# Altium PCB Bento_Pad_Mini_PCB.PcbDoc (part 2 of 2)
Units mm, origin at the board's own origin, x right, y up, seen from the top; angles counter-clockwise.
Board outline 80 x 55 mm, 2 copper layers (Top Layer, Bottom Layer), stack 1.448 mm thick; 81 components, 38 nets, 304 pads, 89 vias.
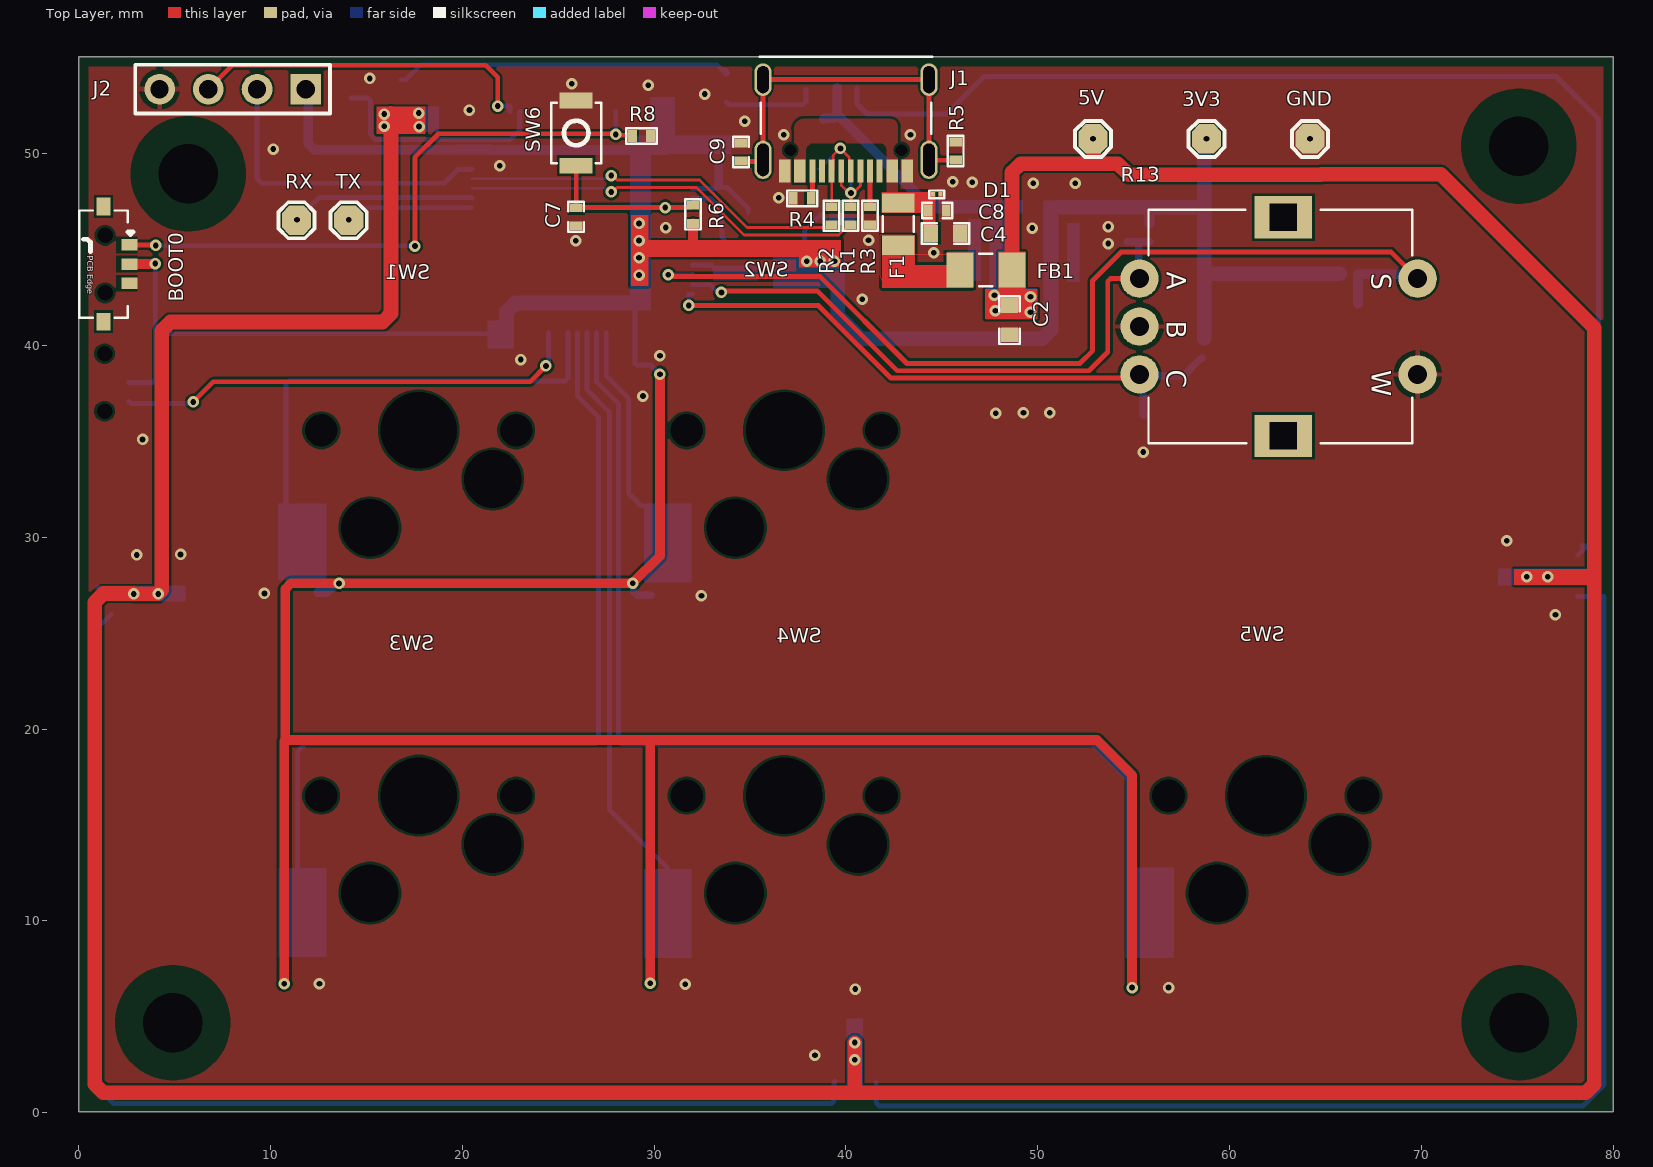
[diagram p0: Top Layer view]

## Part data (continued)
R6 R8 R9 R10 R11 R12 R14 R15 R16 R17 R18 R19: library part RC0402FR-0710KL, "RES 10K OHM 1% 1/16W 0402", Case Code (Imperial)=0402, Case Code (Metric)=1005, LCSC Part Number=C60490, Manufacturer=Yageo, Max Operating Temperature=155°C, Max Power Dissipation=63mW, Min Operating Temperature=-55°C, Power Rating=62.5mW, Resistance=10kR, Resistance Tolerance=1%, Resistor Type="Thick Film", Supplier Part Number 1=603-RC0402FR-0710KL, Temperature Coefficient=100ppm/°C, Voltage Rating=50V, Case/Package=0402, Category="Chip SMD Resistors", ComponentLink1Description=https://datasheet.ciiva.com/7660/38568-7660787.pdf?src-supplier=Element14, ComponentLink1URL=https://datasheet.ciiva.com/7660/38568-7660787.pdf?src-supplier=Element14, ComponentLink2Description=https://datasheet.ciiva.com/7849/1686128-7849814.pdf?src-supplier=Element14, ComponentLink2URL=https://datasheet.ciiva.com/7849/1686128-7849814.pdf?src-supplier=Element14, ComponentLink3Description=https://datasheet.ciiva.com/7983/1018594-7983486.pdf?src-supplier=Element14, ComponentLink3URL=https://datasheet.ciiva.com/7983/1018594-7983486.pdf?src-supplier=Element14, ComponentLink4Description=https://datasheet.ciiva.com/22747/1018594-22747512.pdf?src-supplier=Element14, ComponentLink4URL=https://datasheet.ciiva.com/22747/1018594-22747512.pdf?src-supplier=Element14, ComponentLink5Description=https://datasheet.ciiva.com/12667/pyu-rc0402-51-rohs-l-6-r-12667067.pdf?src-supplier=Mouser, ComponentLink5URL=https://datasheet.ciiva.com/12667/pyu-rc0402-51-rohs-l-6-r-12667067.pdf?src-supplier=Mouser, ComponentLink6Description=https://datasheet.ciiva.com/7849/1784430-7849813.pdf?src-supplier=Element14, ComponentLink6URL=https://datasheet.ciiva.com/7849/1784430-7849813.pdf?src-supplier=Element14, ComponentLink7Description=https://datasheet.ciiva.com/7849/1784430-7849815.pdf?src-supplier=Element14, ComponentLink7URL=https://datasheet.ciiva.com/7849/1784430-7849815.pdf?src-supplier=Element14, Construction=Rectangular, Depth=0.5mm, Features="Moisture Resistant", Height=0.32mm, Item Type=Resistor, Lead Free="Lead Free", Lead Pitch=0.2mm, Length=1mm, Manufacturer Part Number=RC0402FR-0710KL, Military Standard=Not, Number of Pins=2, Number of Terminations=2, Packaging="Tape and Reel", Pricing 1="1=0.10000, 10=0.01400, 50=0.01400, 100=0.00500, 1000=0.00300, 10000=0.00200 (USD)", REACH SVHC="No SVHC", RoHS=Yes, RoHS Compliant=Yes, Series=RC, Stock 1=18648329, Supplier 1=Mouser, Termination=SMD/SMT, Tolerance=1%, Voltage Rating (DC)=50V, Width=0.5mm, Working Voltage=50V
R7: library part RC0402FR-071ML, "RES 1M OHM 1% 1/16W 0402", Case Code (Imperial)=0402, Case Code (Metric)=1005, LCSC Part Number=C138033, Manufacturer=Yageo, Max Operating Temperature=155°C, Max Power Dissipation=63mW, Min Operating Temperature=-55°C, Resistance Tolerance=1%, Resistor Type="Thick Film", Supplier Part Number=311-1.00MLRCT-ND, Temperature Coefficient=100ppm/°C, Voltage Rating=50V, Case/Package=0402, Category="Chip SMD Resistors", ComponentLink1Description=https://datasheet.ciiva.com/11808/0900766b80c66297-11808125.pdf?src-supplier=Rs, ComponentLink1URL=https://datasheet.ciiva.com/11808/0900766b80c66297-11808125.pdf?src-supplier=Rs, ComponentLink2Description=https://datasheet.ciiva.com/46394/1018594-46394951.pdf?src-supplier=Element14, ComponentLink2URL=https://datasheet.ciiva.com/46394/1018594-46394951.pdf?src-supplier=Element14, ComponentLink3Description=https://datasheet.ciiva.com/7849/1018594-7849883.pdf?src-supplier=Element14, ComponentLink3URL=https://datasheet.ciiva.com/7849/1018594-7849883.pdf?src-supplier=Element14, ComponentLink4Description=https://datasheet.ciiva.com/7849/1018594-7849882.pdf?src-supplier=Element14, ComponentLink4URL=https://datasheet.ciiva.com/7849/1018594-7849882.pdf?src-supplier=Element14, ComponentLink5Description=https://datasheet.ciiva.com/16741/pyu-rc0402-51-rohs-l-6-r-16741081.pdf?src-supplier=Future+Electronics, ComponentLink5URL=https://datasheet.ciiva.com/16741/pyu-rc0402-51-rohs-l-6-r-16741081.pdf?src-supplier=Future+Electronics, Construction=Rectangular, Depth=0.5mm, Features="Moisture Resistant", Height=0.32mm, Item Type=Resistor, Lead Free=5697LeadFree, Length=1mm, Manufacturer Part Number=RC0402FR-071ML, Military Standard=Not, Number of Terminations=2, Packaging="Tape and Reel", Power Rating=63mW, Pricing="1=0.1, 10=0.015, 50=0.0088, 100=0.0073, 500=0.00488, 1000=0.00417, 5000=0.00297 (USD)", Reach SVHC Compliant=Unknown, RoHS=Yes, RoHS Compliant=Yes, Series=RC, Stock=6516, Supplier=Digikey, Technology="THICK FILM", Termination=SMD/SMT, Tolerance=1%, Voltage Rating (AC)=50V
R13: "11mm Encoder with 24 Detent Force 20mm Metal Flatted Shaft PC Pin Horizontal/Rear Facing", LCSC Part Number=-, Manufacturer=Bourns, Package=Custom, Supplier Part Number=118-PEC11H-4220F-S0024-ND, ComponentLink1Description=Digikey, ComponentLink1URL=https://www.digikey.com/en/products/detail/bourns-inc/PEC11H-4220F-S0024/12349532, Item Type=Encoder, Manufacturer Part Number=PEC11H-4220F-S0024, Pricing="1=3.04, 5=2.746, 10=2.565, 25=2.3516, 75=2.194, 150=2.0646, 300=1.89023, 450=1.77209, 975=1.65958 (USD)", RoHS=No, Stock=1001, Supplier=Digikey
R20: library part RC0603FR-07499RL, "RES 499 OHM 1% 1/10W 0603", Case Code (Imperial)=0603, Case Code (Metric)=1608, LCSC Part Number=C137714, Manufacturer=Yageo, Max Operating Temperature=155°C, Max Power Dissipation=100mW, Min Operating Temperature=-55°C, Package Quantity=1, Resistor Type="Thick Film", Supplier Part Number 1=1995585, Temperature Coefficient=100ppm/°C, Tolerance=1%, Voltage Rating=50V, Case/Package=0603, Category="Chip SMD Resistors", ComponentLink1Description=https://datasheet.ciiva.com/11808/0900766b80f96399-11808558.pdf?src-supplier=RSComponents, ComponentLink1URL=https://datasheet.ciiva.com/11808/0900766b80f96399-11808558.pdf?src-supplier=RSComponents, ComponentLink2Description=https://datasheet.ciiva.com/2453/pyu-r-int-thick-7-2453956.pdf?src-supplier=Digi-Key, ComponentLink2URL=https://datasheet.ciiva.com/2453/pyu-r-int-thick-7-2453956.pdf?src-supplier=Digi-Key, ComponentLink3Description=https://datasheet.ciiva.com/2453/pyu-r-int-thick-7-2453957.pdf?src-supplier=Digi-Key, ComponentLink3URL=https://datasheet.ciiva.com/2453/pyu-r-int-thick-7-2453957.pdf?src-supplier=Digi-Key, ComponentLink4Description=https://datasheet.ciiva.com/2453/pyu-r-int-thick-7-2453955.pdf?src-supplier=Digi-Key, ComponentLink4URL=https://datasheet.ciiva.com/2453/pyu-r-int-thick-7-2453955.pdf?src-supplier=Digi-Key, ComponentLink5Description=https://datasheet.ciiva.com/12558/rc0603-272842-12558391.pdf?src-supplier=Mouser, ComponentLink5URL=https://datasheet.ciiva.com/12558/rc0603-272842-12558391.pdf?src-supplier=Mouser, ComponentLink6Description=https://datasheet.ciiva.com/8885/pyu-rc0603-51-rohs-l-4-8885483.pdf?src-supplier=Avnet, ComponentLink6URL=https://datasheet.ciiva.com/8885/pyu-rc0603-51-rohs-l-4-8885483.pdf?src-supplier=Avnet, Construction=Rectangular, Contact Plating=Tin,Matte, Depth=0.8mm, Features="Moisture Resistant", Height=0.45mm, Lead Free="Lead Free", Length=1.6mm, Manufacturer Part Number=RC0603FR-07499RL, Military Standard=Not, Mount="Surface Mount", Number of Terminations=2, Packaging="Tape and Reel", Power Rating=100mW, Pricing 1="5000=0.00300, 10000=0.00300, 15000=0.00300, 20000=0.00200 (GBP)", Radiation Hardening=No, Resistance=499R, RoHS=Yes, RoHS Compliant=Yes, Series=RC, Size Code=0603, Stock 1=900, Supplier 1=RSComponents, Technology="THICK FILM", Termination=SMD/SMT, Voltage Rating (DC)=50V, Width=0.031inch
SW1 SW2 SW3 SW4 SW5: "SMD,14.5x5.9mm Mechanical Keyboard Shaft ROHS", LCSC Part Number=C41430893, Manufacturer=HanElectricity, Package=SMD,14.5x5.9mm, ComponentLink1Description=LCSC, ComponentLink1URL=https://www.lcsc.com/product-detail/Mechanical-Keyboard-Shaft_HanElectricity-CPG151101S11-16_C41430893.html?s_z=n_%2520CPG151101S11-16, Item Type="Mechanical Keyboard Shaft", Manufacturer Part Number=CPG151101S11-16
SW6: "SWITCH TACTILE SPST-NO 0.05A 12V", Contact Current Rating=50mA, Contact Resistance=100mR, Insulation Resistance=100MR, LCSC Part Number=C231329, Manufacturer=Omron, Max Operating Temperature=70°C, Max Voltage Rating (DC)=12V, Min Operating Temperature=-25°C, Operating Force=1.5N, Package Quantity=1, Ratings="Dust Proof,IP40", Supplier Part Number 1=SW1020DKR-ND, Actuator Length=0.4mm, Actuator Type=Standard, ComponentLink1Description=http://www.farnell.com/datasheets/60838.pdf?src-supplier=Farnell, ComponentLink1URL=http://www.farnell.com/datasheets/60838.pdf?src-supplier=Farnell, ComponentLink2Description=http://www.farnell.com/datasheets/60838.pdf?src-supplier=Element14, ComponentLink2URL=http://www.farnell.com/datasheets/60838.pdf?src-supplier=Element14, ComponentLink3Description=https://omronfs.omron.com/en_US/ecb/products/pdf/en-b3u.pdf?src-supplier=Digi-Key, ComponentLink3URL=https://omronfs.omron.com/en_US/ecb/products/pdf/en-b3u.pdf?src-supplier=Digi-Key, ComponentLink4Description=http://www.omron.com/ecb/products/pdf/en-b3u.pdf?src-supplier=Digi-Key, ComponentLink4URL=http://www.omron.com/ecb/products/pdf/en-b3u.pdf?src-supplier=Digi-Key, ComponentLink5Description=https://www.distrelec.biz/Web/Downloads/he/et/B3U_eng_datasheet.pdf?mime=application%2Fpdf&src-supplier=Distrelec, ComponentLink5URL=https://www.distrelec.biz/Web/Downloads/he/et/B3U_eng_datasheet.pdf?mime=application%2Fpdf&src-supplier=Distrelec, ComponentLink6Description=http://www.onlinecomponents.com/productFiles/mf-OM/en-b3u.pdf?src-supplier=Onlinecomponents.com, ComponentLink6URL=http://www.onlinecomponents.com/productFiles/mf-OM/en-b3u.pdf?src-supplier=Onlinecomponents.com, ComponentLink7Description=https://www.verical.com/server-webapp/html/getDatasheet?partID=552554&src-supplier=Verical, ComponentLink7URL=https://www.verical.com/server-webapp/html/getDatasheet?partID=552554&src-supplier=Verical, ComponentLink8Description=http://www.farnell.com/datasheets/1685550.pdf?src-supplier=Element14, ComponentLink8URL=http://www.farnell.com/datasheets/1685550.pdf?src-supplier=Element14, ComponentLink9Description=http://www.farnell.com/datasheets/2610940.pdf?src-supplier=Farnell, ComponentLink9URL=http://www.farnell.com/datasheets/2610940.pdf?src-supplier=Farnell, ComponentLink10Description=https://www.alliedelec.com/m/d/4c8a9ef82804fc3c241a13c1e298fd73.pdf?src-supplier=Allied+Electronics, ComponentLink10URL=https://www.alliedelec.com/m/d/4c8a9ef82804fc3c241a13c1e298fd73.pdf?src-supplier=Allied+Electronics, Contact Material=Silver, Current Rating=50mA, Depth=2.5mm, Electrical Life=200000Cycles, Height=1.2mm, Illumination Type=Non-Illuminated,Illuminated, Item Type=Switch, Lead Free="Lead Free", Length=4mm, Manufacturer Part Number=B3U-1000P, Max Current Rating=50mA, Mechanical Life=200000Cycles, Mount="Surface Mount", Orientation=Straight, Packaging="Tape and Reel", Pricing 1="1=1, 10=0.961, 25=0.9064, 50=0.7976, 100=0.7251, 250=0.68888, 500=0.67074, 1000=0.52571 (USD)", REACH SVHC=Unknown, Stock 1=116454, Supplier 1=Digi-Key, Switch Function=Off-Mom, Switch Travel=0.15mm, Termination=SMD/SMT, Throw Configuration=SPST, Voltage Rating (DC)=12V, Weight=0.000776oz, Width=3mm
U1: "IC REG LINEAR 3.3V 1A SOT223-6", LCSC Part Number=C485803, Manufacturer="Texas Instruments", Supplier Part Number=595-TPS79633DCQR, Category="Voltage Regulators - Linear", ComponentLink1Description=https://datasheet.ciiva.com/2045/tps79601-2045264.pdf?src-supplier=Digi-Key, ComponentLink1URL=https://datasheet.ciiva.com/2045/tps79601-2045264.pdf?src-supplier=Digi-Key, ComponentLink2Description=https://datasheet.ciiva.com/22704/1846966-22704703.pdf?src-supplier=Element14, ComponentLink2URL=https://datasheet.ciiva.com/22704/1846966-22704703.pdf?src-supplier=Element14, ComponentLink3Description=https://datasheet.ciiva.com/41462/001015136-da-01-en-ic-reg-ldo-3-3v-1-tps79633dcqr-sot-6-tid-41462982.pdf?src-supplier=Conrad, ComponentLink3URL=https://datasheet.ciiva.com/41462/001015136-da-01-en-ic-reg-ldo-3-3v-1-tps79633dcqr-sot-6-tid-41462982.pdf?src-supplier=Conrad, Item Type=IC, Length=6.5mm, Manufacturer Part Number=TPS79633DCQR, Pricing="1=3.24, 10=2.75, 50=2.75, 100=2.39, 1000=1.72, 10000=1.56 (USD)", RoHS=Yes, Stock=3089, Supplier=Mouser, Thickness=1.6mm, Width=3.5mm
U2: "IC MCU 32BIT 256KB FLASH 64LQFP", Case/Package=LQFP, Clock Frequency=72MHz, LCSC Part Number=C8323, Manufacturer=STMicroelectronics, Max Operating Temperature=85°C, Max Supply Voltage=3.6V, Min Operating Temperature=-40°C, Min Supply Voltage=2V, Package Quantity=960, Supplier Part Number 1=511-STM32F103RCT6, Category=Microcontrollers, ComponentLink1Description=https://datasheet.ciiva.com/4845/cd00191185-4845648.pdf?src-supplier=Mouser, ComponentLink1URL=https://datasheet.ciiva.com/4845/cd00191185-4845648.pdf?src-supplier=Mouser, ComponentLink2Description=https://datasheet.ciiva.com/8054/1831497-8054949.pdf?src-supplier=Element14, ComponentLink2URL=https://datasheet.ciiva.com/8054/1831497-8054949.pdf?src-supplier=Element14, ComponentLink3Description=https://datasheet.ciiva.com/5752/cd00191185-5752853.pdf?src-supplier=Farnell, ComponentLink3URL=https://datasheet.ciiva.com/5752/cd00191185-5752853.pdf?src-supplier=Farnell, ComponentLink4Description=https://datasheet.ciiva.com/9224/cd00191185-9224408.pdf?src-supplier=Avnet, ComponentLink4URL=https://datasheet.ciiva.com/9224/cd00191185-9224408.pdf?src-supplier=Avnet, ComponentLink5Description=https://datasheet.ciiva.com/16382/cd00191185-16382444.pdf?src-supplier=Future+Electronics, ComponentLink5URL=https://datasheet.ciiva.com/16382/cd00191185-16382444.pdf?src-supplier=Future+Electronics, Core Architecture=ARM, Data Bus Width=32b, Height=1.4mm, Interface=I2C,SPI,USB,CAN,USART, Item Type=IC, Lead Free="Lead Free", Length=10mm, Manufacturer Part Number=STM32F103RCT6, Memory Format=FLASH, Memory Size=256KB, Number of ADC Channels=16, Number of I/Os=51, Number of Timers/Counters=8, Packaging=Tray, Pins=64, Pricing 1="1=9.74000, 10=8.79000, 50=8.38000, 100=7.28000, 1000=5.58000, 10000=5.58000 (USD)", RAM Size=48KB, RoHS=Yes, RoHS Compliant=Yes, Series=STM32F103RC, Stock 1=44788, Supplier 1=Mouser, Weight=0.012088oz, Width=10mm
U3: "IC BUF NON-INVERT 5.5V SOT23-5", Case/Package=SOT-23-5, High Level Output Current=-8mA, LCSC Part Number=C100024, Low Level Output Current=8mA, Manufacturer="Texas Instruments", Max Operating Temperature=125°C, Max Supply Voltage=5.5V, Min Operating Temperature=-40°C, Min Supply Voltage=1.6V, Package Quantity=3000, Quiescent Current=1uA, Supplier Part Number 1=296-37176-6-ND, ComponentLink1Description=http://www.ti.com/lit/pdf/sdyu001?src-supplier=Digi-Key, ComponentLink1URL=http://www.ti.com/lit/pdf/sdyu001?src-supplier=Digi-Key, ComponentLink2Description=http://www.ti.com/lit/ds/symlink/sn74lv1t34.pdf?src-supplier=Avnet, ComponentLink2URL=http://www.ti.com/lit/ds/symlink/sn74lv1t34.pdf?src-supplier=Avnet, Item Type=IC, Lead Free="Lead Free", Logic Function=Buffer,Inverting, Manufacturer Part Number=SN74LV1T34DBVR, Mount="Surface Mount", Number of Bits=1, Number of Bits per Element=1, Number of Channels=1, Number of Elements=1, Number of Input Lines=1, Number of Inputs=1, Number of Output Lines=1, Number of Outputs=1, Number of Pins=5, Operating Supply Current=8mA, Packaging="Tape and Reel", Polarity=Non-Inverting, Pricing 1="1=0.43, 10=0.349, 25=0.3192, 100=0.2374, 250=0.2152, 500=0.17808, 1000=0.13356 (USD)", Propagation Delay=15.5ns, Radiation Hardening=No, REACH SVHC="No SVHC", RoHS Compliant=Yes, Stock 1=37360, Supplier 1=Digi-Key, Weight=0.000353oz
X1: library part 0153G2-8.000F20DTNJL, "8MHz Surface Mount Crystal 20pF ±10ppm ±30ppm SMD5032 Crystals ROHS", LCSC Part Number=C19270155, Manufacturer=HCI, Package=SMD5032, ComponentLink1Description=LCSC, ComponentLink1URL=https://www.lcsc.com/product-detail/Crystals_HCI-0153G2-8-000F20DTNJL_C19270155.html, Item Type=Crystal, Manufacturer Part Number=0153G2-8.000F20DTNJL

## Free pads (board coordinates)
  round 0 hole 3.1 unplated paste-2539.97 mask+0.051: MH(4.902,4.699) MH(5.715,48.946) MH(75.082,50.394) MH(75.108,4.699)

## Via types
v1: diameter 0.6, hole 0.3, Top Layer to Bottom Layer, tented both sides, 86 vias
v2: diameter 0.6, hole 0.3, Top Layer to Bottom Layer, 3 vias

## Nets (pads, with @x,y where several pads share a name; then routed paths per layer and width w, separated by ;. In a path a pad name is that pad's centre, name@x,y a point inside that pad or via, vN(x,y) a via of type N, cw(c..) or ccw(c..) an arc to the next point about the centre after c; other vN are vias at no path point)
3V3: 3V3.1 BOOT0.C BOOT1.C C1.2 C10.1 C11.1 C12.1 C13.1 C14.2 C18.2 C33.1 FB2.2 J2.1 R6.2 R10.1 R11.2 R12.2 R14.2 R15.1 R16.1 R17.1 R18.1 U1.4 U2.1 U2.19 U2.32 U2.48 U2.64 | length 236.9
  Top Layer w0.508: BOOT0.C 3.988,44.245 v1(3.988,44.272) ; v1(10.719,6.731) 10.719,19.384 10.77,19.435 ; v1(29.794,6.756) 29.794,19.435 ; v1(30.302,38.506) 30.302,29.032 v1(28.88,27.61) 28.874,27.604 13.574,27.604 v1(13.568,27.598) 13.556,27.61 11.067,27.61 10.77,27.312 10.77,19.435 ; 32.029,45.187 R6.2 ; v1(54.915,6.528) 54.915,17.602 53.082,19.435 29.794,19.435 ; 10.77,19.435 29.794,19.435
  Bottom Layer w0.254: BOOT1.C 3.839,38.073 3.988,38.222 3.988,40.615 ; v1(3.988,44.272) 3.988,40.615 ; 22.022,40.615 3.988,40.615 ; 28.922,42.574 29.032,42.685 ; C12.1@28.998,39.052 U2.19 28.998,42.104 ; C12.1 29.134,38.951 29.167,38.984 29.817,38.984 30.295,38.506 v1(30.302,38.506) ; 29.189,44.056 29.225,44.021 ; 29.21,46.749 29.185,46.723 29.185,44.133 29.261,44.056 29.225,44.021 ; 29.426,42.618 29.185,42.86 29.185,43.98 29.225,44.021 ; 33.164,50.732 33.172,50.724
  Bottom Layer w0.381: v1(28.88,27.61) 28.922,27.568 28.922,27.169 29.103,26.987 R15.1
  Bottom Layer w0.508: v1(10.719,6.731) 10.719,7.455 R16.1 ; J2.1@11.963,53.365 11.963,50.526 12.286,50.203 C33.1@18.326,50.203 ; R10.1 12.916,27.14 13.356,27.58 13.533,27.58 v1@13.551,27.598 ; C33.1@18.453,50.203 19.717,50.203 19.74,50.226 21.256,50.226 ; 21.438,50.226 21.256,50.226 ; 22.022,40.615 22.022,40.64 ; 29.192,50.185 29.202,50.195 ; 29.235,50.228 29.202,50.195 ; v1(29.794,6.756) R17.1 ; 30.455,50.47 30.645,50.279 ; 31.382,50.47 30.874,50.47 30.645,50.241 30.645,50.195 29.202,50.195 ; v1(54.915,6.528) R18.1 ; R12.2@55.829,46.368 55.829,47.219 55.855,47.219 ; 21.256,50.226 21.287,50.195 29.202,50.195
  Bottom Layer w0.762: 22.022,40.64 22.301,40.919 22.301,41.768 22.748,42.215 29.108,42.215 ; FB2.2@36.779,44.187 FB2.2@36.789,44.196 ; v1@39.395,44.425 39.573,44.247 39.573,41.586 40.799,40.361 50.239,40.361 50.686,40.807 U1.4@50.686,44.426 ; C1.2@50.851,47.219 55.829,47.219 ; 55.855,47.219 58.623,47.219 ; R11.2@58.674,40.385 58.674,43.739 ; v1(58.801,50.775) 58.674,50.775 58.674,43.739 ; R14.2@65.748,43.739 58.674,43.739
  other v1: 29.21,43.675 37.948,44.399 38.659,44.399 39.395,44.399 29.21,44.573 29.21,45.47 29.21,46.368
3V3#: C27.1 FB2.1 U2.13 | length 1.6
  Bottom Layer w0.254: U2.13 32.979,44.195 33.21,43.963 33.21,43.904 33.312,43.802 C27.1
5V: 5V.1 C2.2 C3.2 C5.2 C15.2 C23.2 C24.2 C25.2 C26.2 FB1.2 LED1.2 LED2.2 LED3.2 LED4.2 R19.2 U1.2 U3.5 | length 241.6
  Top Layer w0.762: v1(15.926,52.07) 16.243,52.07 16.269,52.095 16.281,52.083 16.281,41.671 15.835,41.224 4.781,41.224 4.335,40.778 4.335,27.246 v1(4.14,27.051) v1(2.87,27.051) 2.851,27.07 1.285,27.07 0.838,26.624 0.838,1.488 1.285,1.041 40.437,1.041 78.573,1.041 79.019,1.488 79.019,27.889 78.981,27.927 ; 40.462,1.067 v1(40.462,3.658) ; FB1.2 48.655,49.04 49.101,49.487 54.171,49.487 54.762,48.895 64.752,48.895 64.781,48.924 71.017,48.924 79.019,40.922 79.019,27.965 78.981,27.927 ; v2(52.883,50.775) 52.908,50.749 52.908,49.563 ; v1(76.581,27.94) 78.969,27.94 78.981,27.927
  Bottom Layer w0.381: 47.955,46.977 48.044,46.977
  Bottom Layer w0.508: C15.2 38.849,51.829 38.875,51.854 39.367,51.854 39.55,52.038 ; LED1.2 39.55,52.038 ; C5.2@47.828,47.131 44.456,47.131 39.55,52.038
  other v1: 40.462,2.769 75.489,27.94 49.619,41.732 47.79,41.808 49.619,42.545 47.739,42.621 17.744,51.414 15.926,51.435 17.729,52.121
BOOT_0: BOOT0.1 R8.1 U2.60 | length 32.5
  Top Layer w0.254: BOOT0.1 3.983,45.245 v1(4.011,45.218) ; v1(17.526,45.187) 17.526,49.809 18.754,51.038 27.676,51.038 ; v1@27.777,51.059 27.941,51.059 v1(27.998,51.003) ; v1@27.998,50.993 28.031,50.96 28.834,50.96 R8.1
  Bottom Layer w0.254: v1(4.011,45.218) 4.026,45.202 17.51,45.202 v1(17.526,45.187) ; v1(27.998,51.003) U2.60
BOOT_1: BOOT1.1 R9.2 U2.28 | length 24.4
  Top Layer w0.254: v1(5.969,37.059) 7.022,38.112 23.532,38.112 v1(24.359,38.938)
  Bottom Layer w0.254: BOOT1.1 2.73,36.97 5.786,36.97 5.875,37.059 v1(5.969,37.059) ; v1(24.359,38.938) 24.359,39.032 24.498,39.171 U2.28
D+: D3.1 J1.A6 J1.B6 R2.1 | length 6.2
  Top Layer w0.14: R2.1 39.25,47.238 J1.B6@39.25,49.092 ; J1.B6 39.33,49.191 39.33,49.897 v1(39.708,50.275) ; v1@39.726,50.292 v1(39.708,50.275) ; J1.A6 40.17,49.191 40.17,49.813 v1(39.708,50.275)
  Bottom Layer w0.14: D3.1 38.616,49.2 39.691,50.275 v1(39.708,50.275)
D-: D2.1 J1.A7 J1.B7 R1.1 | length 4.8
  Top Layer w0.14: J1.A7@39.755,49.111 39.755,48.331 40.041,48.045 40.257,48.045 v1@40.259,48.044 ; R1.1 40.259,47.256 v1(40.259,47.957) v1@40.259,48.044 ; J1.B7@40.755,49.111 40.755,48.33 40.468,48.044 v1@40.259,48.044
  Bottom Layer w0.14: v1(40.259,47.957) D2.1@40.259,49.149
ENC_BUTTON: C21.2 R13.S R14.1 U2.14 | length 52.1
  Top Layer w0.254: v1(30.734,43.688) 30.8,43.622 31.028,43.622 31.056,43.594 38.651,43.594 43.18,39.065 52.195,39.065 52.857,39.728 52.857,43.392 54.337,44.872 68.421,44.872 R13.S
  Bottom Layer w0.254: v1(30.734,43.688) 30.737,43.691 31.994,43.691 U2.14
  Bottom Layer w0.508: C21.2 R14.1 69.579,43.713 R13.S
ENC_CHA: C20.2 R12.1 R13.A U2.15 | length 32.5
  Top Layer w0.254: v1(33.503,42.769) 33.569,42.835 38.521,42.835 42.672,38.684 52.668,38.684 53.645,39.661 53.645,43.342 53.794,43.491 R13.A
  Bottom Layer w0.254: U2.15 32.021,43.172 32.923,43.172 33.26,42.835 33.436,42.835 v1(33.503,42.769)
  Bottom Layer w0.381: C20.2 55.26,45.402 ; R13.A 55.26,43.533 55.26,45.402 ; R12.1 55.26,45.402
ENC_CHB: C22.2 R11.1 R13.B U2.16 | length 31.8
  Top Layer w0.254: v1(31.801,42.088) 38.563,42.088 42.348,38.303 55.114,38.303 R13.B
  Bottom Layer w0.254: v1(31.801,42.088) 31.801,42.672 31.975,42.672 U2.16
  Bottom Layer w0.381: R13.B 55.487,38.306 55.487,36.398 55.525,36.36 C22.2 ; R13.B@55.375,38.418 57.601,38.418 58.502,39.319 58.547,39.319 R11.1@58.547,39.342
GND: C1.1 C2.1 C3.1 C4.2 C5.1 C6.1 C7.2 C8.2 C9.1 C10.2 C11.2 C12.2 C13.2 C14.1 C15.1 C16.1 C17.1 C18.1 C20.1 C21.1 C22.1 C23.1 C24.1 C25.1 C26.1 C27.2 C28.1 C29.1 C30.1 C31.1 C32.1 C33.2 D1.2 D2.2 D3.2 GND.1 J1.A1/B12 J1.B1/A12 J2.4 LED1.4 LED2.4 LED3.4 LED4.4 R3.2 R4.2 R5.2 R8.2 R9.1 R13.C R13.W SW1.1 SW2.1 SW3.1 SW4.1 SW5.1 SW6.2 U1.3 U1.6 U2.12 U2.18 U2.31 U2.47 U2.63 U3.3
  other v1: 38.379,2.997 40.488,6.452 56.82,6.528 31.623,6.706 12.548,6.731 76.987,25.959 32.461,26.949 9.677,27.076 3.023,29.083 5.309,29.108 74.447,29.82 55.499,34.442 3.327,35.103 47.803,36.474 49.251,36.5 50.622,36.5 29.413,37.363 23.038,39.268 30.302,39.472 40.843,42.418 44.577,44.831 53.67,45.314 25.908,45.466 41.173,45.491 49.708,46.126 30.607,46.152 53.67,46.203 36.5,47.701 49.759,48.463 51.953,48.456 46.584,48.514 45.568,48.539 21.946,49.378 10.135,50.241 64.186,50.775 36.754,50.993 43.358,50.993 34.722,51.689 20.371,52.273 32.639,53.111 29.693,53.569 25.705,53.645 15.173,53.924
LED_DO_3V3: U2.50 U3.2 | length 11.9
  Bottom Layer w0.254: U3.2 15.066,52.908 15.215,52.759 15.215,50.989 15.47,50.733 19.529,50.733 ; 19.53,50.734 21.466,50.734 ; 21.466,50.733 22.48,50.733 22.975,51.228 22.975,52.172 U2.50
LED_DO_5V0: R20.1 U3.4 | length 17.5
  Bottom Layer w0.254: U3.4 17.044,53.858 17.821,54.635 33.287,54.635 33.693,54.229 R20.1
  Bottom Layer w0.381: R20.1@33.691,54.295 R20.1
NetC6_2: C6.2 U1.5
NetC9_2: C9.2 J1.S1 J1.S2 J1.S3 J1.S4 R5.1 | length 19.6
  Top Layer w0.254: C9.2@34.519,49.593 35.593,49.593 ccw(c35.593,49.681) J1.S1@35.68,49.681 ; J1.S1 J1.S2 J1.S3 J1.S4 44.351,49.656 R5.1
NetF1_2: F1.2 FB1.1
NetJ1_A5: J1.A5 R3.1 | length 1.9
  Top Layer w0.254: R3.1 41.25,49.106 J1.A5@41.255,49.111
NetJ1_B5: J1.B5 R4.1 | length 1.5
  Top Layer w0.254: R4.1@38.202,47.638 ccw(c38.202,47.691) R4.1@38.255,47.691 ; R4.1@38.255,47.676 J1.B5@38.255,49.111
NetLED1_1: LED1.1 R20.2 | length 5
  Bottom Layer w0.254: R20.2 33.909,52.553 37.765,52.553 37.919,52.706 37.919,53.341 LED1.1@37.94,53.362
NetLED1_3: LED1.3 LED2.1 | length 65
  Bottom Layer w0.254: LED1.3 40.575,52.592 41.097,52.07 45.257,52.07 47.213,54.026 77.016,54.026 79.223,51.82 79.223,29.718 79.065,29.56 LED2.1@78.363,29.56 ; LED2.1@78.155,29.075 LED2.1@78.526,29.446
NetLED2_3: LED2.3 LED3.1 | length 66.4
  Bottom Layer w0.254: LED3.1@41.575,1.562 41.575,0.504 41.724,0.356 78.439,0.356 79.531,1.447 79.531,26.924 79.53,26.925 LED2.3 LED2.3@78.124,26.925
NetLED3_3: LED3.3 LED4.1 | length 65
  Bottom Layer w0.254: LED4.1@1.699,25.984 0.762,25.047 0.762,1.55 1.829,0.483 39.224,0.483 39.373,0.632 39.373,1.578 LED3.3@39.425,1.63
NetR19_1: R19.1 U1.1 | length 0
  Bottom Layer w0.508: U1.1@46.75,44.437 U1.1
OSC_IN: C17.2 R7.1 U2.5 X1.1 | length 3.6
  Bottom Layer w0.254: U2.5 33.225,48.195 33.299,48.269 R7.1 33.353,48.244 33.605,48.244 33.617,48.233 33.811,48.233 34.905,47.139 X1.1
OSC_OUT: C16.2 R7.2 U2.6 X1.2 | length 9.9
  Bottom Layer w0.254: U2.6 32.021,47.672 32.923,47.672 33.21,47.384 33.388,47.384 33.49,47.282 33.49,47.171 33.528,47.133 33.528,45.655 33.844,45.339 37.683,45.339 37.832,45.488 37.832,45.965 38.705,46.838 X1.2@38.959,46.584
RST: C7.1 R6.1 SW6.1 U2.7 | length 10
  Top Layer w0.254: C7.1 SW6.1@25.933,49.646 ; C7.1@25.933,47.207 25.953,47.187 30.575,47.187 v1(30.582,47.193) 31.69,47.193 31.703,47.206 31.928,47.206 R6.1
  Bottom Layer w0.254: v1(30.582,47.193) U2.7@31.997,47.194
RX: RX.1 U2.43 | length 9.6
  Bottom Layer w0.254: v2(11.379,46.558) 12.537,47.716 20.477,47.716 U2.43
SW#1: C28.2 R10.2 SW1.2 U2.26 | length 28.5
  Bottom Layer w0.254: SW1.2@11.095,31.196 10.795,31.496 10.795,38.002 10.944,38.151 25.349,38.151 25.498,38.3 25.498,38.431 U2.26@25.498,40.694 ; 11.227,28.41 11.811,28.41 ; SW1.2@11.811,31.569 11.811,28.41 ; 12.357,28.448 12.395,28.41 11.811,28.41
SW#2: C29.2 R15.2 SW2.2 U2.22 | length 11.7
  Bottom Layer w0.254: U2.22 27.498,38.415 28.677,37.236 28.677,32.283 29.311,31.649 29.584,31.649 30.707,30.526 SW2.2
SW#3: C30.2 R16.2 SW3.2 U2.25 | length 45.2
  Bottom Layer w0.254: SW3.2 11.41,11.698 11.41,18.849 11.807,19.246 26.94,19.246 27.102,19.408 27.102,36.271 25.998,37.375 U2.25
SW#4: C31.2 R17.2 SW4.2 U2.24 | length 29.7
  Bottom Layer w0.254: U2.24 26.498,37.688 27.661,36.525 27.661,15.792 30.707,12.746 SW4.2@30.707,12.721
SW#5: C32.2 R18.2 SW5.2 U2.23 | length 56.2
  Bottom Layer w0.254: U2.23 26.998,38.102 28.143,36.957 28.143,19.377 28.292,19.228 52.857,19.228 54.704,17.381 54.704,12.599 54.952,12.351 55.023,12.351 55.88,11.494 SW5.2@55.88,11.169 ; SW5.2@54.966,12.294 SW5.2@55.131,12.459
SWDCLK: J2.3 U2.49 | length 18.3
  Top Layer w0.254: J2.3 8.001,54.61 21.212,54.61 21.844,53.978 v1(21.844,52.484)
  Bottom Layer w0.254: v1(21.844,52.484) 22.475,52.484 22.475,52.218 U2.49
SWDIO: J2.2 U2.46 | length 16.3
  Bottom Layer w0.254: J2.2 9.296,48.705 9.538,48.463 19.044,48.463 19.752,49.172 20.475,49.172 U2.46
TX: TX.1 U2.42 | length 6.7
  Bottom Layer w0.254: v2(14.072,46.558) 14.698,47.185 U2.42@20.488,47.185
USB_D_N: R1.2 U2.44 | length 21
  Top Layer w0.14: v1(27.762,48.006) 27.844,48.006 28.074,48.236 32.207,48.236 32.707,47.736 34.685,45.758 39.616,45.758 R1.2@39.986,46.128
  Bottom Layer w0.14: U2.44 27.762,48.195 v1(27.762,48.006)
USB_D_P: R2.2 U2.45 | length 20.2
  Top Layer w0.14: v1(27.762,48.86) 27.844,48.86 28.074,48.63 32.37,48.63 33.101,47.9 34.848,46.152 R2.2@39.453,46.152
  Bottom Layer w0.14: U2.45 23.282,48.695 23.447,48.695 24.638,48.695 27.762,48.695 v1(27.762,48.86)
VBUS: C4.1 C8.1 D1.1 F1.1 J1.A4/B9 J1.B4/A9
pads on no net: BOOT0.2 BOOT0.4 BOOT0.5 BOOT0.MH BOOT1.2 BOOT1.4 BOOT1.5 BOOT1.MH J1.A8 J1.B8 J1.MH LED4.3 R13.MH1 R13.MH2 SW1. SW2. SW3. SW4. SW5. U2.2 U2.3 U2.4 U2.8 U2.9 U2.10 U2.11 U2.17 U2.20 U2.21 U2.27 U2.29 U2.30 U2.33 U2.34 U2.35 U2.36 U2.37 U2.38 U2.39 U2.40 U2.41 U2.51 U2.52 U2.53 U2.54 U2.55 U2.56 U2.57 U2.58 U2.59 U2.61 U2.62 U3.1

## Polygon pours and split planes (outlines as drawn)
GND on Top Layer "GND_L01_P004" (solid, pour order 4): 0,0.051 0,55.051 80,55.051 80,0.051
NetF1_2 on Top Layer "NETF1_2_L01_P001" (solid, pour order 1): 41.758,45.745 41.758,43.764 ccw(c42.418,43.764) 42.418,43.104 46.558,43.104 ccw(c46.558,43.18) 46.634,43.18 46.634,44.831 ccw(c46.609,44.831) 46.609,44.856 45.441,44.856 ccw(c45.39,44.679) 45.212,44.729 ccw(c45.161,44.679) 45.11,44.729 43.485,44.729 cw(c43.485,44.755) 43.459,44.755 43.459,45.72 ccw(c43.434,45.72) 43.434,45.745
VBUS on Top Layer "VBUS_L01_P000" (solid, pour order 0): 37.897,48.514 37.897,50.14 cw(c38.303,50.14) 38.303,50.546 41.783,50.546 cw(c41.783,50.216) 42.113,50.216 42.113,47.142 42.697,47.142 42.697,51.333 ccw(c42.278,51.397) 42.342,51.816 37.744,51.816 ccw(c37.833,51.282) 37.299,51.193 37.299,48.514
GND on Bottom Layer "GND_L02_P003" (solid, remove dead copper, pour order 3): -0.043,0.094 -0.043,55.094 79.781,55.094 79.781,0.094

## Other copper
Top Layer:
  rectangle net 5V: 74.828,27.508 79.4,28.346
  rectangle net NetF1_2: 41.874,43.002 46.627,44.196
  rectangle net VBUS: 44.019,45.407 44.66,47.447
  rectangle net NetF1_2: 41.874,43.078 43.586,45.738
  rectangle net 5V: 16.637,51.029 18.085,52.451
  rectangle net 5V: 15.519,51.029 17.628,52.451
  rectangle net 3V3: 28.778,44.628 39.751,45.491
  rectangle net 3V3: 37.541,44.069 39.751,45.288
  rectangle net 3V3: 28.778,43.104 29.693,46.812
  rectangle net 5V: 47.955,41.504 49.352,44.907
  rectangle net 5V: 47.244,41.377 49.987,42.938
  rectangle net VBUS: 41.859,46.914 44.657,48.016
Bottom Layer:
  rectangle net 5V: 40.03,0.864 40.894,4.902
  rectangle net 5V: 0.864,26.645 5.563,27.483
  rectangle net 5V: 73.99,27.483 79.074,28.372
  rectangle net 3V3: 28.753,49.987 34.011,50.952
  rectangle net SW#2: 29.461,27.635 31.953,31.76
  rectangle net OSC_OUT: 39.116,46.279 40.488,46.888
  rectangle net 5V: 47.295,41.326 49.951,43.002
  rectangle net 5V: 44.526,46.872 49.225,47.574
  rectangle net NetR19_1: 46.355,43.358 47.041,46.609
  rectangle net 5V: 17.399,51.13 18.136,52.451
  rectangle net 3V3: 28.727,41.834 29.845,50.47
  rectangle net SW#1: 10.383,27.788 12.929,31.771
  rectangle net SW#5: 54.585,8.077 57.099,12.776
  rectangle net SW#4: 29.464,8.077 31.953,12.721
  rectangle net 5V: 47.473,41.377 48.666,47.244
  rectangle net 3V3: 29.82,50.038 31.09,52.946
  rectangle net SW#3: 10.414,8.128 12.903,12.751
  rectangle net 3V3: 36.195,43.002 39.954,44.761
  rectangle net 5V: 15.57,51.13 18.771,52.451
  rectangle net NetC6_2: 51.511,43.307 52.172,46.387
  rectangle net 3V3: 50.292,43.409 51.079,47.549
  rectangle net OSC_IN: 33.147,48.117 33.595,49.581
  rectangle net 3V3#: 33.071,43.383 35.408,44.171
  rectangle net 3V3: 21.311,39.853 22.682,41.3
Multi-Layer:
  pour cut-out: 72.108,4.699 ccw(c75.108,4.699) 75.108,1.699 ccw(c75.108,4.699) 78.108,4.699 ccw(c75.108,4.699) 75.108,7.699 ccw(c75.108,4.699)
  pour cut-out: 2.715,48.946 ccw(c5.715,48.946) 5.715,45.946 ccw(c5.715,48.946) 8.715,48.946 ccw(c5.715,48.946) 5.715,51.946 ccw(c5.715,48.946)
  pour cut-out: 72.082,50.394 ccw(c75.082,50.394) 75.082,47.394 ccw(c75.082,50.394) 78.082,50.394 ccw(c75.082,50.394) 75.082,53.394 ccw(c75.082,50.394)
  pour cut-out: 1.902,4.699 ccw(c4.902,4.699) 4.902,1.699 ccw(c4.902,4.699) 7.902,4.699 ccw(c4.902,4.699) 4.902,7.699 ccw(c4.902,4.699)

## Silkscreen, mask and mechanical layers (free items; w line width, h text height)
Board Outline:
  lines w0.127: 0,0 80,0 80,55 0,55 0,0

## Text inside footprints (layer, text, board x,y; h text height)
BOOT0: Top Overlay "PCB Edge" at 0.447,44.679 h0.3 r270
BOOT1: Bottom Overlay "PCB Edge" at 0.422,37.64 h0.3 r270
J1: Mechanical 13 "PCB Edge" at 41.338,54.484 h0.8 r180
LED1: Bottom Overlay "-" at 41.408,52.787 h0.5 r180; Bottom Overlay "+" at 39.376,52.787 h0.5 r180
LED2: Bottom Overlay "-" at 77.748,26.092 h0.5 r90; Bottom Overlay "+" at 77.621,28.132 h0.5 r90
LED3: Bottom Overlay "-" at 38.592,2.252 h0.5; Bottom Overlay "+" at 40.629,2.668 h0.5
LED4: Bottom Overlay "+" at 2.338,26.91 h0.5 r270; Bottom Overlay "-" at 2.252,28.908 h0.5 r270
R13: Top Overlay "C" at 56.732,38.733 h1 r270; Top Overlay "A" at 56.732,43.839 h1 r270; Top Overlay "B" at 56.732,41.299 h1 r270; Top Overlay "W" at 67.4,38.708 h1 r270; Top Overlay "S" at 67.4,43.763 h1 r270